# Altium PCB Audio-Switch-v2.0.PcbDoc (part 3 of 3)
Units mil, origin at the board's own origin, x right, y up, seen from the top; angles counter-clockwise.
Board outline 3937.01 x 3149.61 mil, 4 copper layers (Top Layer, Ground Layer, Power Layer, Bottom Layer), stack 60.4 mil thick; 165 components, 115 nets, 627 pads, 263 vias.
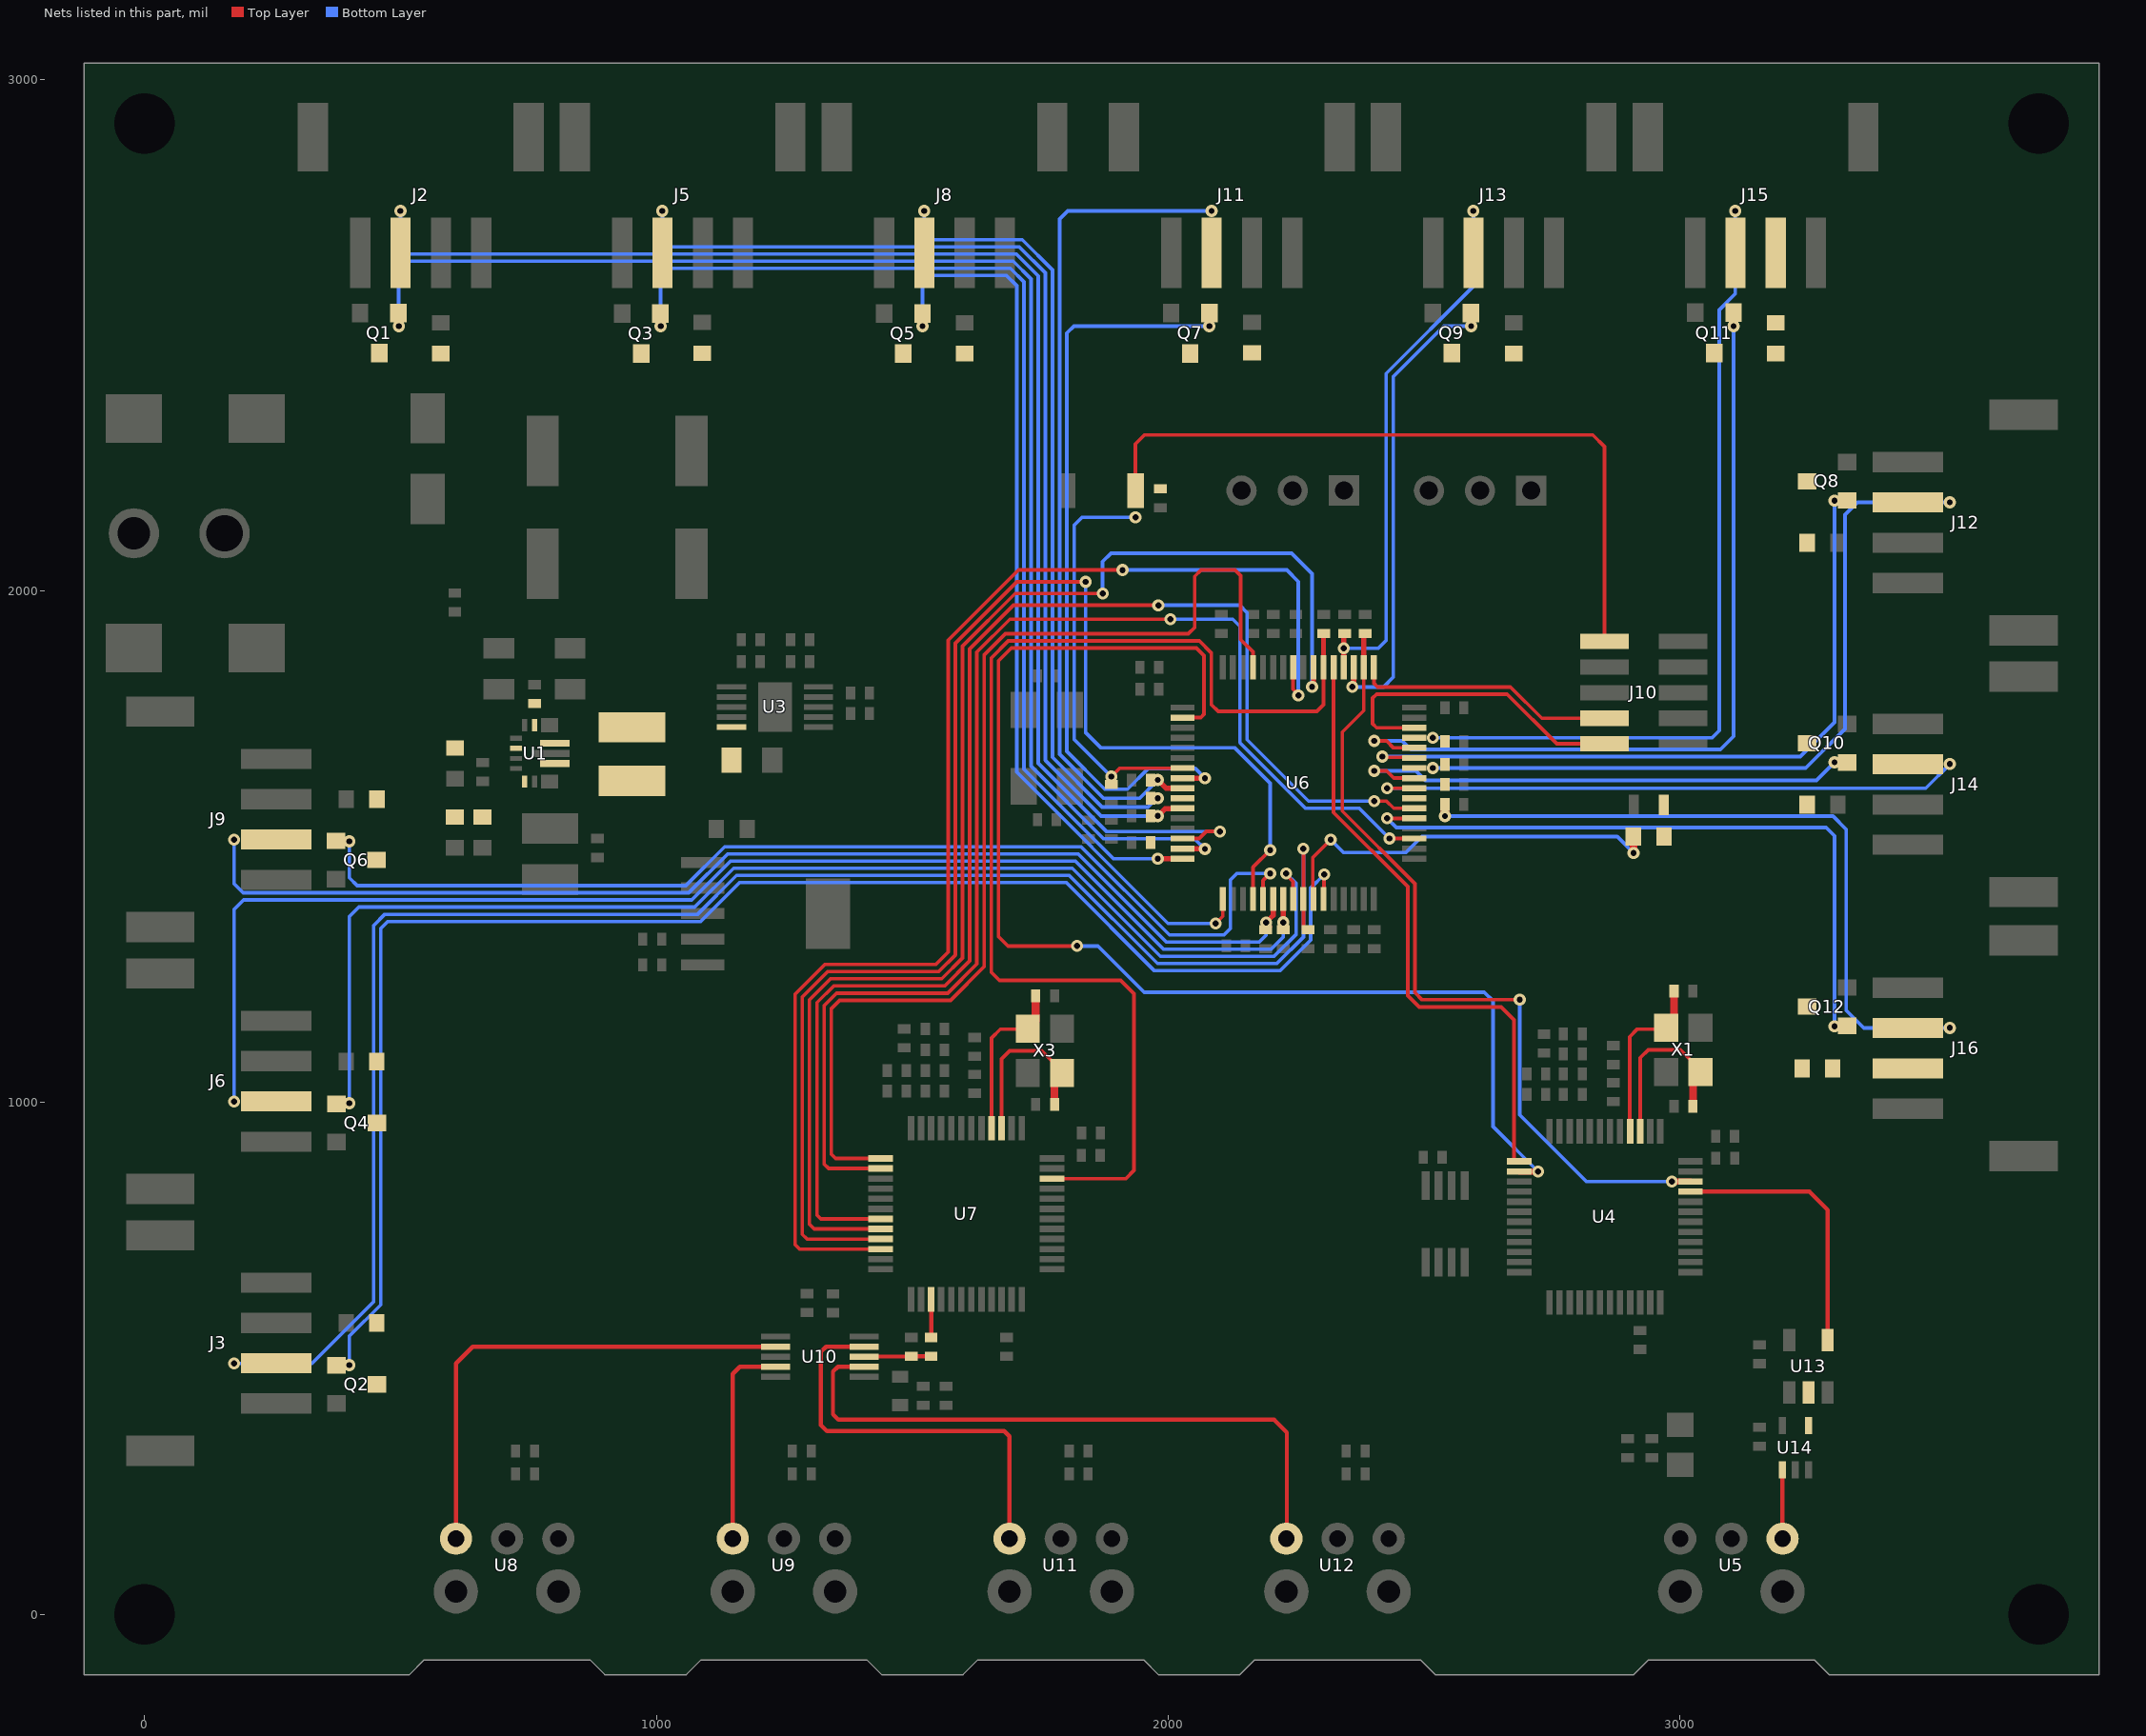
[diagram p4: the nets of this part, all layers, seen from the top]

## Via types
v1: diameter 23.62, hole 11.81, Top Layer to Bottom Layer, 263 vias

## Nets (pads, with @x,y where several pads share a name; then routed paths per layer and width w, separated by ;. In a path a pad name is that pad's centre, name@x,y a point inside that pad or via, vN(x,y) a via of type N, cw(c..) or ccw(c..) an arc to the next point about the centre after c; other vN are vias at no path point) (continued)
NetJ15_2: J15.2 R38.2
NetJ16_2: J16.2 R39.2
NetL1_1: L1.1 U1.11
NetL1_2: L1.2 U1.9
NetLED1_1: LED1.1 R16.2
NetQ1_3: Q1.3 R9.1
NetQ2_3: Q2.3 R10.1
NetQ3_3: Q3.3 R12.1
NetQ4_3: Q4.3 R13.1
NetQ5_3: Q5.3 R17.1
NetQ6_3: Q6.3 R18.1
NetQ7_3: Q7.3 R20.1
NetQ8_3: Q8.3 R21.1
NetQ9_3: Q9.3 R35.1
NetQ10_3: Q10.3 R36.1
NetQ11_3: Q11.3 R38.1
NetQ12_3: Q12.3 R39.1
NetR1_2: R1.2 U1.14
NetR2_1: R2.1 R4.2 U1.5
NetR3_1: R3.1 U1.2
NetR5_1: R5.1 U3.5
NetR44_2: R44.2 U7.15 | length 74.6
  Top Layer w7: R44.2@1536.69,540.99 R44.2@1537.8,542.09
  Top Layer w8.28: R44.2@1536.8,542.09 U7.15@1536.8,615.17
OUT1_LED1: Q1.1 U6.15 | length 2771.1
  Top Layer w10: U6.15@2028.11,1496.49 2028.52,1496.09 2071.36,1496.09 v1(2071.77,1495.68)
  Bottom Layer w7: v1(496.44,2517.83) 496.44,2629.31 511.84,2644.72 1697.45,2644.72 1732.06,2610.11 1732.06,1657.54 1873.64,1515.96 2051.49,1515.96 v1(2071.77,1495.68)
OUT1_LED2: Q3.1 U6.16 | length 2159.8
  Top Layer w10: v1(1979.88,1476.81) U6.16@2028.11,1476.81
  Bottom Layer w7: v1(1008.25,2517.83) 1008.25,2615.53 1023.44,2630.72 1691.65,2630.72 1718.06,2604.32 1718.06,1651.74 1892.99,1476.81 v1(1979.88,1476.81)
OUT1_LED3: Q5.1 U6.17 | length 1798
  Top Layer w7: v1(2092.97,1350.09) 2106.85,1363.95 U6.17@2106.85,1398.07
  Bottom Layer w7: v1(1520.06,2517.83) 1520.06,2601.03 1535.75,2616.72 1684.05,2616.72 1704.06,2596.72 1704.06,1645.94 1999.92,1350.08 v1(2092.97,1350.09)
OUT1_SW1: J2.3 R24.1 U6.14 | length 2782.4
  Top Layer w7: U6.14@2028.11,1516.18 2060.72,1516.18 2074.9,1530.36 2100.54,1530.36 v1(2100.95,1529.96)
  Bottom Layer w7: v1(499.79,2742.93) 499.79,2671.35 512.42,2658.72 1703.25,2658.72 1746.06,2615.91 1746.06,1663.34 1879.44,1529.96 v1(2100.95,1529.96)
OUT1_SW2: J5.3 R25.1 U6.11 | length 2117.6
  Top Layer w7: R25.1@1965.72,1560.16 1970.25,1560.16 1970.25,1568.09 R25.1@1971.22,1569.07
  Top Layer w10: v1(1979.88,1560.16) 1994.05,1574.33 2027.21,1574.33 U6.11@2028.11,1575.23
  Bottom Layer w7: v1(1011.6,2742.93) 1011.6,2686.44 1025.32,2672.72 1709.05,2672.72 1760.06,2621.71 1760.06,1669.14 1869.04,1560.16 v1(1979.88,1560.16)
OUT1_SW3: J8.3 R26.1 U6.10 | length 1529.8
  Bottom Layer w7: v1(1523.41,2742.93) 1523.41,2699.12 1535.81,2686.72 1714.85,2686.72 1774.06,2627.51 1774.06,1674.94 1871.08,1577.91 1960.81,1577.91 1977.91,1595.01 v1(1979.88,1595.01)
OUT2_LED1: Q7.1 U6.8 | length 1470.6
  Top Layer w7: U6.8@2028.11,1634.29 U6.8@2028.25,1634.15 ; v1@2071.77,1634.15 v1(2071.91,1634.01)
  Top Layer w10: U6.8@2028.25,1634.15 v1@2071.77,1634.15
  Bottom Layer w7: v1(2071.91,1634.01) 2053.01,1652.91 1960.87,1652.91 1920.52,1612.57 1876.02,1612.57 1802.06,1686.54 1802.06,2504.07 1815.81,2517.83 v1(2080.44,2517.83)
OUT2_LED2: Q9.1 U6.51 | length 908
  Top Layer w10: v1(2360.13,1812.45) v1@2361.85,1814.17 ; U6.51@2361.85,1849.92 U6.51@2362.76,1850.82 ; v1@2362.85,1814.17 U6.51@2362.85,1849.92
  Bottom Layer w7: v1(2360.13,1812.45) 2420.86,1812.45 2439.95,1831.53 2439.95,2419.16 2538.62,2517.83 v1(2592.25,2517.83)
OUT2_LED3: Q11.1 U6.44 | length 1606.1
  Top Layer w7: v1(2402.49,1707.12) 2426.79,1707.12 2440.57,1693.34 U6.44@2480.87,1693.34
  Bottom Layer w7: v1(2402.49,1707.12) 2457.5,1707.12 2474.38,1690.25 3079.25,1690.25 3105.06,1716.06 v1(3105.06,2517.83)
OUT2_SW1: J11.3 R27.1 U6.9 | length 1646.6
  Top Layer w10: v1(1979.88,1630.6) 1995.88,1614.6 U6.9@2028.11,1614.6
  Bottom Layer w7: v1(1979.88,1630.6) 1944.23,1594.95 1873.84,1594.95 1788.06,1680.74 1788.06,2727.07 1803.91,2742.93 v1(2084.79,2742.93)
OUT2_SW2: J13.3 R28.1 U6.52 | length 1065.6
  Top Layer w10: v1@2343.04,1888 R28.1@2343.04,1916.95 ; U6.52@2343.07,1850.82 v1(2343.07,1888)
  Bottom Layer w7: v1(2343.07,1888) 2410.53,1888 2425.95,1903.41 2425.95,2424.96 2596.6,2595.61 v1(2596.6,2742.93)
OUT2_SW3: J15.3 R29.1 U6.45 | length 1594.7
  Bottom Layer w7: v1(2517,1713.06) 3063.1,1713.06 3077.17,1727.12 3077.17,2549.58 3108.41,2580.82 v1(3108.41,2742.93)
OUT3_LED1: Q2.1 U6.27 | length 3017.2
  Top Layer w7: U6.27@2303.7,1398.07 2304.34,1398.71 2304.34,1445.41 v1(2304.98,1446.05)
  Bottom Layer w7: v1(399.91,486.95) 399.91,543.45 461.25,604.79 461.25,1340.32 474.94,1354.02 1086.36,1354.02 1162.43,1430.09 1801.12,1430.09 1973.43,1257.78 2218.49,1257.78 2278.33,1317.62 2278.33,1419.4 v1(2304.98,1446.05)
OUT3_LED2: Q4.1 U6.24 | length 2526.2
  Top Layer w7: v1(2230.39,1447.86) 2230.39,1446.05 2244.24,1432.19 2244.24,1398.47 U6.24@2244.65,1398.07
  Bottom Layer w7: v1(399.91,998.76) 399.91,1363.39 418.54,1382.02 1074.76,1382.02 1150.83,1458.09 1812.72,1458.09 1985.03,1285.78 2206.9,1285.78 2250.33,1329.21 2250.33,1427.91 v1(2230.39,1447.86)
OUT3_LED3: Q6.1 U6.21 | length 2140.6
  Top Layer w7: U6.21@2185.59,1398.07 2185.59,1434.08 v1(2199.37,1447.86)
  Bottom Layer w7: v1(399.91,1510.57) 399.91,1439.5 415.39,1424.02 1057.36,1424.02 1133.43,1500.09 1830.11,1500.09 2002.42,1327.78 2108.96,1327.78 2121.66,1340.47 2121.66,1435.29 2134.23,1447.86 v1(2199.37,1447.86)
OUT3_SW1: J3.3 R30.1 U6.25 | length 3339.8
  Top Layer w7: R30.1@2264.33,1337.97 v1(2264.33,1496.49)
  Bottom Layer w7: v1(174.81,490.3) 326.96,490.3 447.25,610.59 447.25,1346.12 469.14,1368.02 1080.56,1368.02 1156.63,1444.09 1806.92,1444.09 1979.23,1271.78 2212.69,1271.78 2264.33,1323.42 v1(2264.33,1496.49)
OUT3_SW2: J6.3 R31.1 U6.23 | length 2620.3
  Top Layer w10: v1(2224.96,1352.27) U6.23@2224.96,1398.07
  Bottom Layer w7: v1(174.81,1002.11) 174.81,1377.39 193.43,1396.02 1068.96,1396.02 1145.03,1472.09 1818.52,1472.09 1990.82,1299.78 2201.1,1299.78 2224.96,1323.64 v1(2224.96,1352.27)
OUT3_SW3: J9.3 R32.1 U6.22 | length 2313.1
  Top Layer w7: R32.1@2194.09,1337.97 R32.1@2199.59,1343.47
  Top Layer w10: R32.1@2190.59,1340.55 v1@2190.59,1350.47 ; v1(2191.55,1352.24) 2205.28,1365.97 U6.22@2205.28,1398.07
  Bottom Layer w7: v1(174.81,1513.92) 174.81,1427.61 192.4,1410.02 1063.16,1410.02 1139.23,1486.09 1824.32,1486.09 1990.01,1320.39 1996.62,1313.78 2178.16,1313.78 2191.55,1327.16 v1(2191.55,1352.24)
OUT4_LED1: Q8.1 U6.43 | length 1408.9
  Top Layer w7: v1(2418.35,1676.27) 2419.65,1674.97 2479.56,1674.97 U6.43@2480.87,1673.66
  Bottom Layer w7: v1(2418.35,1676.27) 2418.38,1676.31 2468.51,1676.31 2468.58,1676.25 3235.22,1676.25 3302.38,1743.42 v1(3302.38,2176.82)
OUT4_LED2: Q10.1 U6.41 | length 1006.2
  Top Layer w7: v1(2402.49,1648.47) 2426.88,1648.47 2441.06,1634.29 U6.41@2480.87,1634.29
  Bottom Layer w7: v1(2402.49,1648.47) 2484.09,1648.47 2502.58,1629.99 3267.15,1629.99 v1(3302.21,1665.05)
OUT4_LED3: Q12.1 U6.37 | length 1313.5
  Top Layer w7: v1(2428,1555.55) U6.37@2480.87,1555.55
  Bottom Layer w7: v1(2428,1555.55) 2445.87,1537.68 3286.18,1537.68 3302.38,1521.48 v1(3302.38,1149.34)
OUT4_SW1: J12.3 R33.1 U6.42 | length 1470.8
  Bottom Layer w7: v1(2517,1653.94) v1(2517,1653.94) 3246.16,1653.97 3322.74,1730.55 3322.74,2148.91 3347.29,2173.47 v1(3527.48,2173.47)
OUT4_SW2: J14.3 R34.1 U6.40 | length 1169.4
  Top Layer w7: v1(2428,1614.6) U6.40@2478.39,1614.6
  Bottom Layer w7: v1(2428,1614.6) 3480.43,1614.6 v1(3527.48,1661.66)
OUT4_SW3: J16.3 R37.1 U6.39 | length 1387.6
  Top Layer w17: v1(2541,1560) R37.1@2540.98,1582.42
  Bottom Layer w7: v1(2541,1560) 3299.26,1560 3325.15,1534.11 3325.15,1180.4 3359.56,1145.99 v1(3527.48,1145.99)
OUT_CK: U6.55 U7.8 | length 2596.3
  Top Layer w7: U7.8@1438.37,752.96 1308.36,752.96 1299.1,762.22 1299.1,1200.59 1340.51,1242 1557.62,1242 1598.31,1282.69 1598.31,1892.24 1701.07,1995 v1(1872,1995)
  Top Layer w10: v1(2281.39,1812.45) v1@2283.11,1814.17 ; U6.55@2283.11,1849.92 U6.55@2284.02,1850.82 ; v1@2284.11,1814.17 U6.55@2284.11,1849.92
  Bottom Layer w7: v1(1872,1995) 1872,2057.44 1888.37,2073.8 2241.11,2073.8 2281.39,2033.52 v1(2281.39,1812.45)
OUT_MCK: U6.38 U7.7 | length 2698.4
  Top Layer w7: U7.7@1438.37,772.65 1321.32,772.65 1313.96,780 1313.96,1195.65 1346.31,1228 1563.42,1228 1612.31,1276.89 1612.31,1886.44 1697.93,1972.05 v1(1980.87,1972.05) ; v1(2402.49,1589.42) 2426.77,1589.42 2440.96,1575.23 U6.38@2480.87,1575.23
  Bottom Layer w7: v1(1980.87,1972.05) 2139.76,1972.05 2154.31,1957.5 2154.31,1709.37 2274.27,1589.42 v1(2402.49,1589.42)
OUT_SD: U6.57 U7.10 | length 2635.4
  Top Layer w7: U7.10@1438.37,713.59 1280.07,713.59 1271.1,722.56 1271.1,1212.19 1328.91,1270 1546.02,1270 1570.31,1294.29 1570.31,1903.84 1707.48,2041 v1(1911,2041) ; U6.57@2244.21,1850.38 2244.21,1808.11 2254.49,1797.83 v1(2254.49,1795.7)
  Bottom Layer w7: v1(1911,2041) 2232.03,2041 2254.49,2018.54 v1(2254.49,1795.7)
OUT_WS: U6.20 U7.9 | length 2804
  Top Layer w7: U7.9@1438.37,733.28 1294.36,733.28 1285.1,742.53 1285.1,1206.39 1334.71,1256 1551.82,1256 1584.31,1288.49 1584.31,1898.04 1704.28,2018 v1(1838.57,2018) ; U6.20@2165.91,1398.07 2165.91,1460.12 v1(2199.37,1493.59)
  Bottom Layer w7: v1(1838.57,2018) 1838.57,1723.81 1869.04,1693.34 2130.37,1693.34 2199.37,1624.34 v1(2199.37,1493.59)
OUT_Y: U13.2 U14.4
PB0: R16.1 U6.26 | length 792.2
  Top Layer w7: U6.26@2284.02,1398.07 2282.67,1399.41 2282.67,1479.19 v1(2317.48,1514) ; R16.1@2908.96,1520 R16.1@2909.17,1519.79
  Top Layer w15: R16.1@2908.96,1520 2909.41,1519.55 2909.41,1488.24 v1(2909.65,1488)
  Bottom Layer w7: v1(2317.48,1514) 2342.53,1488.95 2464.67,1488.95 2495.71,1520 2877.65,1520 v1(2909.65,1488)
PCM1_ERROR/INT0: U4.1 U6.53 | length 1209.7
  Top Layer w7: U6.53@2323.39,1850.82 2323.39,1566.86 2468.23,1422.02 2468.23,1209.2 2490.79,1186.65 2650.91,1186.65 2675.75,1161.81 2675.75,891.41
  Top Layer w12: U4.1@2675.84,885.32 2676.14,885.02 U4.1@2686.28,885.02
PCM1_NPCM/INT1: U4.2 U6.2 | length 2541.5
  Top Layer w7: v1(1821.93,1306.09) 1686.88,1306.09 1668.31,1324.66 1668.31,1863.24 1693.5,1888.43 2055.33,1888.43 2070,1873.76 2070,1759 2063.82,1752.82 2028.54,1752.82 U6.2@2028.11,1752.4
  Top Layer w12: U4.2@2686.28,865.33 2686.37,865.24 2722.76,865.24 v1(2722.85,865.15)
  Bottom Layer w7: v1(1821.93,1306.09) 1863.08,1306.09 1953.39,1215.78 2617.71,1215.78 2634.75,1198.74 2634.75,953.25 v1(2722.85,865.15)
PCM2_ERROR/INT0: U6.61 U7.1 | length 2149.2
  Top Layer w7: U7.1@1438.37,890.76 1350.03,890.76 1341.96,898.83 1341.96,1184.05 1357.91,1200 1575.02,1200 1640.31,1265.29 1640.31,1874.84 1681.9,1916.43 2039.52,1916.43 2051.73,1928.64 2051.73,2028.44 2064.51,2041.22 2130.53,2041.22 2141.68,2030.08 2141.68,1904.9 2165.73,1880.84 2165.73,1851 U6.61@2165.91,1850.82
PCM2_NPCM/INT1: U6.35 U7.2 | length 2557.7
  Top Layer w7: U7.2@1438.37,871.07 1336.63,871.07 1327.96,879.74 1327.96,1189.85 1352.11,1214 1569.22,1214 1626.31,1271.09 1626.31,1880.64 1690.62,1944.95 v1(2004.49,1944.95) ; v1(2432.54,1516.27) v1(2432.54,1516.27) 2480.82,1516.22 U6.35@2480.87,1516.18
  Bottom Layer w7: v1(2004.49,1944.95) 2126.39,1944.95 2140.31,1931.03 2140.31,1703.58 2268.47,1575.42 2373.39,1575.42 v1(2432.54,1516.27)
PCM_RST1: R15.2 U4.34 U6.50 | length 1607.6
  Top Layer w7: U6.50@2382.44,1850.82 2382.44,1766.18 2340.41,1724.15 2340.41,1569.64 2482.23,1427.82 2482.23,1215 2496.23,1201 v1(2687.1,1201)
  Top Layer w10: U6.50@2382.44,1850.82 2382.44,1887.27 2382.44,1910.45 2388.94,1916.95 R15.2@2392.44,1916.95
  Top Layer w12: v1@2984.44,845.74 U4.34@3020.83,845.74
  Bottom Layer w7: v1(2687.1,1201) 2687.1,975.85 2817.12,845.83 v1(2984.35,845.83)
PCM_RST2: R19.2 U6.54 U7.34 | length 2347.3
  Top Layer w7: U7.34@1773.02,851.39 1917.39,851.39 1933.32,867.32 1933.32,1212.74 1907.36,1238.7 1670.29,1238.7 1654.31,1254.68 1654.31,1869.04 1687.7,1902.43 2061.13,1902.43 2084.26,1879.29 2084.26,1778.22 2097.8,1764.69 2290.4,1764.69 2303.7,1777.99 U6.54@2303.7,1850.82
  Top Layer w10: U6.54@2303.7,1850.82 2303.7,1916.16 R19.2@2304.49,1916.95
RST: C32.2 J10.10 R8.1 SW1.1 U6.7 | length 2199.3
  Top Layer w7: v1(1888.98,1637.26) 1905.23,1653.51 2027.65,1653.51 U6.7@2028.11,1653.97 ; SW1.1@1936.18,2196.25 1936.18,2287.43 1953.75,2305 2829.96,2305 2852.72,2282.24 J10.10@2852.72,1901.25
  Bottom Layer w7: v1(1888.98,1637.26) 1816.26,1709.98 1816.26,2128.7 1831.71,2144.15 v1(1936.18,2144.15)
SPDIF-IN: U5.3 U14.1 | length 134.8
  Top Layer w8.28: U14.1@3200.16,282.09 3200.45,281.8 3200.45,147.84 U5.3@3200.75,147.55
SPDIF-INN: U4.33 U13.4 | length 520.8
  Top Layer w8.28: U4.33@3037.44,825.96 3253.02,825.96 3288.74,790.24 U13.4@3288.74,535.58
SPDIF-OUT: R43.2 R44.1 U10.8 | length 109.7
  Top Layer w8.28: U10.8@1427.15,503.64 1498.08,503.64 R43.2@1498.43,503.99 R44.1@1536.69,503.99
SPDIF-OUT1: U8.1 U10.2 | length 980.9
  Top Layer w8.28: U8.1@608.23,147.55 608.23,490.23 640.98,522.98 U10.2@1232.87,522.98
SPDIF-OUT2: U9.1 U10.4 | length 411.7
  Top Layer w8.28: U9.1@1149.17,147.54 1149.17,469.83 1162.95,483.61 U10.4@1232.87,483.61
SPDIF-OUT3: U10.9 U11.1 | length 810.1
  Top Layer w8.28: U10.9@1406.1,522.98 1331.35,522.98 1321.36,512.99 1321.36,369.61 1332.97,358 1679.65,358 1690,347.65 U11.1@1690,147.55
SPDIF-OUT4: U10.7 U12.1 | length 1258.2
  Top Layer w8.28: U10.7@1406.1,483.61 1354.52,483.61 1345,474.09 1345,390.61 1355.61,380 2207.17,380 2232,355.17 2232,148.49 U12.1@2231.06,147.55
SWDCLK: J10.4 U6.49 | length 510.2
  Top Layer w7: U6.49@2402.13,1850.82 2402.13,1819.45 2409.14,1812.45 2669.09,1812.45 2730.28,1751.25 J10.4@2852.72,1751.25
SWDIO: J10.2 U6.46 | length 631.2
  Top Layer w7: U6.46@2480.87,1732.71 2407.31,1732.71 2399.69,1740.34 2399.69,1790.7 2407.44,1798.45 2662.55,1798.45 2759.75,1701.25 J10.2@2852.72,1701.25
XTI_1: C30.2 U4.39 X1.1 | length 361.6
  Top Layer w7: U4.39@2922.5,944.07 2922.5,1087.5 2938.25,1103.24 3001.19,1103.24 3040.56,1063.87 X1.1@3040.56,1059.94 X1.1@3025.6,1044.97
  Top Layer w15: C30.2@3025.6,992.75 X1.1@3025.6,1044.97
XTI_2: C65.2 U7.39 X3.1 | length 347.8
  Top Layer w7: U7.39@1674.59,949.81 1674.59,1085.5 1690.34,1101.24 1753.28,1101.24 1792.65,1061.87 X3.1@1792.65,1057.94 X3.1@1778,1043.28
  Top Layer w15: C65.2@1778,996.75 X3.1@1778,1043.28
XTO_1: C31.2 U4.40 X1.3 | length 371.6
  Top Layer w7: U4.40@2902.17,944.72 2902.17,1128.71 2917.18,1143.72 X1.3@2970.81,1143.72 ; X1.3@2973.64,1132 2959.08,1132 X1.3@2970.81,1143.72 ; X1.3@2988.61,1161.52 X1.3@2973.64,1146.55 X1.3@2970.81,1143.72
  Top Layer w15: X1.3@2988.61,1161.52 C31.2@2988.61,1218
XTO_2: C66.2 U7.40 X3.3 | length 359.4
  Top Layer w7: U7.40@1654.91,949.81 1654.91,1126.23 1672.27,1143.59 X3.3@1724.76,1143.59 ; X3.3@1725.73,1130 1711.17,1130 X3.3@1724.76,1143.59 ; X3.3@1741,1159.82 X3.3@1725.73,1144.55 X3.3@1724.76,1143.59
  Top Layer w15: X3.3@1741,1159.82 C66.2@1741,1209
pads on no net: J1.3 J1.MH1 J1.MH2 J2.P1 J2.P2 J3.P1 J3.P2 J5.P1 J5.P2 J6.P1 J6.P2 J8.P1 J8.P2 J9.P1 J9.P2 J10.6 J10.7 J10.8 J11.P1 J11.P2 J12.P1 J12.P2 J13.P1 J13.P2 J14.P1 J14.P2 J15.P1 J15.P2 J16.P1 J16.P2 U3.4 U4.3 U4.4 U4.5 U4.6 U4.7 U4.8 U4.9 U4.10 U4.11 U4.12 U4.13 U4.14 U4.15 U4.16 U4.20 U4.28 U4.29 U4.30 U4.31 U4.32 U4.35 U4.37 U4.47 U4.48 U5.4 U5.5 U6.3 U6.4 U6.56 U7.3 U7.4 U7.5 U7.6 U7.11 U7.12 U7.13 U7.14 U7.16 U7.17 U7.18 U7.19 U7.20 U7.28 U7.29 U7.30 U7.31 U7.32 U7.33 U7.35 U7.37 U7.47 U7.48 U8.4 U8.5 U9.4 U9.5 U11.4 U11.5 U12.4 U12.5

## Polygon pours and split planes (outlines as drawn)
NetR2_1 on Top Layer "NETR2_1_L01_P000" (solid, pour order 0): 588.63,1592.99 677.51,1592.99 677.51,1627.53 747.25,1627.53 747.25,1577.64 723.23,1577.64 723.23,1543.14 588.63,1543.15
GND on Top Layer "GND_L01_P005" (solid, pour order 5): -118.11,-118.11 -118.11,3031.5 3818.9,3031.5 3818.9,-118.11
DC_IN on Top Layer "DC_IN_L01_P001" (solid, pour order 1): 1100.33,2122.49 1100.33,1984.69 381.57,1984.69 381.57,2238.84 606.02,2238.84 606.02,2122.49
DC_IN on Bottom Layer "DC_IN_L04_P002" (solid, pour order 2): 1070,1815.41 1074.59,1820 1128.59,1820 1133.59,1815 1133.59,1736.71 1142.51,1727.79 1343.17,1727.79 1350,1720.96 1350,1635.83 1344.17,1630 1080,1630 1070,1640
3V3 on Bottom Layer "3V3_L04_P003" (solid, pour order 3): 1583.73,866.27 1598.61,851.39 1819.03,851.39 1828.9,861.25 1828.9,948.77 1817.2,960.46 1685.9,960.46 1670,976.36 1670,1181.14 1661.14,1190 1594.41,1190 1583.73,1179.32
GND on Bottom Layer "GND_L04_P004" (solid, pour order 4): -118.11,-118.11 -118.11,3031.5 3818.9,3031.5 3818.9,-118.11
5V on Power Layer (split plane): 1668.57,2118.61 1668.57,1193 1668.91,1190.39 1669.92,1187.95 1671.52,1185.87 1716.53,1140.85 1718.62,1139.25 1721.06,1138.24 1723.67,1137.9 2807.69,1137.9 2807.69,955.09 1528.2,955.09 1479,1004.29 1479,1976.18 1478.65,1978.79 1477.94,1980.51 1477.65,1981.22 1476.04,1983.31 1453.22,2006.13 1451.13,2007.73 1448.7,2008.74 1446.09,2009.09 1307.85,2009.09 1305.24,2008.74 1302.81,2007.73 1300.72,2006.13 1278.87,1984.28 1277.26,1982.19 1276.26,1979.76 1275.91,1977.15 1275.91,1492.72 1143.34,1492.72 1140.73,1492.38 1139.01,1491.66 1138.3,1491.37 1136.21,1489.77 1058.59,1412.14 585.46,1412.14 563.96,1433.64 563.96,1762.69 584.18,1782.91 1002,1782.91 1004.61,1783.26 1007.04,1784.27 1009.13,1785.87 1054.13,1830.87 1055.74,1832.96 1056.74,1835.39 1057.09,1838 1057.09,2106.5 1092.57,2141.98 1645.19,2141.98
5V_FILT on Power Layer (split plane): 1458.83,1972 1458.83,1002.66 1458.53,1000.41 1458.83,998.16 1458.83,491.04 1459.17,488.43 1460.18,486 1461.78,483.91 1491.82,453.87 1493.91,452.26 1496.34,451.26 1498.95,450.91 3022.82,450.91 3040.91,432.82 3040.91,127.18 3022.82,109.09 676.06,109.09 662.09,123.06 662.09,624.21 677.79,639.91 1258.98,639.91 1261.59,640.26 1264.02,641.26 1266.11,642.87 1288.96,665.71 1291.04,666.58 1293.13,668.18 1294.73,670.27 1295.74,672.7 1296.09,675.31 1296.09,1482.63 1296.09,1502.47 1296.09,1972.97 1312.03,1988.91 1441.91,1988.91
3V3 on Power Layer (split plane): 3798.8,3011.4 3798.8,-98.02 3299.86,-98.02 3277.01,-75.17 3273.97,-72.67 3270.49,-70.81 3266.72,-69.67 3262.8,-69.28 2938.7,-69.28 2934.78,-69.67 2931.01,-70.81 2927.53,-72.67 2924.49,-75.17 2901.64,-98.02 2530.17,-98.02 2507.33,-75.17 2504.28,-72.67 2500.81,-70.81 2497.04,-69.67 2493.11,-69.28 2169.01,-69.28 2167.24,-69.46 2165.09,-69.67 2163.17,-70.25 2161.32,-70.81 2159.09,-72 2157.85,-72.67 2155.88,-74.28 2154.8,-75.17 2131.95,-98.01 1989.23,-98.01 1966.38,-75.17 1963.34,-72.67 1959.86,-70.81 1956.09,-69.67 1952.17,-69.28 1628.07,-69.28 1624.15,-69.67 1620.38,-70.81 1616.9,-72.67 1613.86,-75.17 1591,-98.02 1448.28,-98.02 1425.44,-75.17 1422.39,-72.67 1418.92,-70.82 1415.15,-69.67 1411.23,-69.29 1087.12,-69.29 1083.2,-69.67 1079.43,-70.82 1075.96,-72.67 1072.91,-75.17 1050.07,-98.01 907.34,-98.01 884.49,-75.17 881.45,-72.67 877.97,-70.81 874.2,-69.67 870.28,-69.28 546.18,-69.28 542.26,-69.67 538.49,-70.81 535.01,-72.67 531.97,-75.17 509.12,-98.01 -98.01,-98.01 -98.01,3011.4
GND on Ground Layer (split plane): 3798.8,3011.4 3798.8,-98.02 3299.86,-98.02 3277.01,-75.17 3273.97,-72.67 3270.49,-70.81 3266.72,-69.67 3262.8,-69.28 2938.7,-69.28 2934.78,-69.67 2931.01,-70.81 2927.53,-72.67 2924.49,-75.17 2901.64,-98.02 2530.17,-98.02 2507.33,-75.17 2504.28,-72.67 2500.81,-70.81 2497.04,-69.67 2493.11,-69.28 2169.01,-69.28 2167.24,-69.46 2165.09,-69.67 2163.17,-70.25 2161.32,-70.81 2159.09,-72 2157.85,-72.67 2155.88,-74.28 2154.8,-75.17 2131.95,-98.01 1989.23,-98.01 1966.38,-75.17 1963.34,-72.67 1959.86,-70.81 1956.09,-69.67 1952.17,-69.28 1628.07,-69.28 1624.15,-69.67 1620.38,-70.81 1616.9,-72.67 1613.86,-75.17 1591,-98.02 1448.28,-98.02 1425.44,-75.17 1422.39,-72.67 1418.92,-70.82 1415.15,-69.67 1411.23,-69.29 1087.12,-69.29 1083.2,-69.67 1079.43,-70.82 1075.96,-72.67 1072.91,-75.17 1050.07,-98.01 907.34,-98.01 884.49,-75.17 881.45,-72.67 877.97,-70.81 874.2,-69.67 870.28,-69.28 546.18,-69.28 542.26,-69.67 538.49,-70.81 535.01,-72.67 531.97,-75.17 509.12,-98.01 -98.01,-98.01 -98.01,3011.4

## Other copper
Top Layer:
  region net NetJ7_2: 2329.26,1309.97 2305.71,1309.97 2305.71,1280.72 2329.26,1280.72
  rectangle net 3V3: 2391.83,1337.95 2412.61,1357.86
  rectangle net GND: 2692.1,1003.75 2710.1,1068.19
  region net 3V3: 1692.71,2742.93 1669.1,2742.93 1669.1,2661.01 1692.71,2661.01
  rectangle net 5V: 2729.1,991.39 2747.1,1068.19
  rectangle net 3V3: 2192.78,1944.95 2397.94,1994
  rectangle net GND: 1831.99,1506.18 1901.49,1524.18
  rectangle net 3V3: 1919.72,1495.68 1937.72,1547.66
  rectangle net 3V3: 1876.49,1543.18 1937.72,1595.01
  rectangle net 3V3: 1919.72,1547.66 1937.72,1643.1
  rectangle net GND: 1772.49,1732.4 1953.62,1863.32
  rectangle net 3V3: 2568.99,1569.92 2586.98,1736.71
  rectangle net NetLED1_1: 2958.86,1519.79 2978.54,1601.61
  region net GND: 2414.26,1309.95 2390.71,1309.95 2390.71,1280.7 2414.26,1280.7
  region net GND: 2374.53,1309.96 2350.98,1309.96 2350.98,1280.71 2374.53,1280.71
  region net 3V3: 2285.11,1309.95 2261.56,1309.95 2261.56,1280.7 2285.11,1280.7
  rectangle net 3V3: 2141.94,1291.97 2285.83,1309.97
  rectangle net 5V: 918.23,1408.51 1133.14,1577.64
  rectangle net GND: 737.09,1405.64 896.99,1488.14
  rectangle net NetL1_1: 886.66,1695.44 1017.36,1763.15
  rectangle net DC_IN: 1307.22,1712.34 1330.79,1733.97
  rectangle net GND: 1037.34,2274.06 1100.33,2384.27
  rectangle net GND: 746.34,2274.06 809.33,2384.27
  rectangle net GND: -76.29,1841.17 110,1935.66
  rectangle net GND: 594.2,1937.24 617.81,1959.33
  region net GND: 2951.27,1813.08 2951.27,1789.47 3006.26,1789.47 3006.26,1813.08
  region net GND: 2951.27,1913.08 2951.27,1889.47 3006.26,1889.47 3006.26,1913.08
  rectangle net GND: 2959.02,1736.29 3053.5,1816.21
  rectangle net GND: 2910.15,497.78 2933.81,517.5
  region net GND: 2544.5,881.18 2544.5,918 2520.58,918 2520.58,881.18
  region net 3V3: 2480.26,904.82 2480.26,881.21 2507.5,881.21 2507.5,904.82
  region net GND: 2536.33,905.5 2520.58,905.5 2520.58,837.4 2536.33,837.4
  region net 3V3: 2510.74,905.5 2494.99,905.5 2494.99,837.4 2510.74,837.4
  rectangle net 3V3: 2909.5,545.5 2934.5,572.95
  region net GND: 3016.61,1229.78 3016.61,1206.22 3045.85,1206.22 3045.85,1229.78
  rectangle net XTI_2: 1769,984.25 1787,1009.25
  rectangle net 3V3: 2857.24,976.54 2882.24,1010.75
  rectangle net 3V3: 1609.24,986.29 1634.34,1027.18
  region net GND: 1769,1220.78 1769,1197.22 1798.24,1197.22 1798.24,1220.78
  region net GND: 1750,984.98 1750,1008.53 1720.76,1008.53 1720.76,984.98
  region net GND: 2997.6,980.98 2997.6,1004.53 2968.36,1004.53 2968.36,980.98
  rectangle net 3V3: 2857.97,1102.24 2881.52,1131.49
  rectangle net GND: 2857.24,1029.75 2882.24,1083.24
  rectangle net GND: 1609.34,1046.18 1634.34,1099.2
  rectangle net 3V3: 1610.06,1118.2 1633.61,1147.44
  rectangle net NetC49_2: 1553.7,1010 1571.68,1075.17
  rectangle net NetC64_1: 1553.7,1090.5 1571.7,1156.44
  rectangle net 3V3: 1609.24,949.81 1621.84,1027.18
  rectangle net GND: 1858.71,885.3 1876.72,953.3
  rectangle net GND: 3098,878.5 3116.01,946.5
  rectangle net 3V3: 1749,884.26 1839.71,964.88
  rectangle net GND: 1749,687.61 1797.03,719.89
  rectangle net GND: 1672.52,485.31 1696.13,512.56
  rectangle net 3V3: 1668.29,531.98 1700.58,639.18
  rectangle net A0: 1281.93,570.83 1305.54,598.07
  rectangle net A1: 1332.93,570.65 1356.54,597.89
  region net GND: 1357.07,635.5 1281.5,635.5 1281.5,617.32 1357.07,617.32
  region net GND: 1510.5,559.66 1486.89,559.66 1486.89,532.42 1510.5,532.42
  rectangle net NetFB1_2: 1232.87,458.02 1274.68,469.83
  rectangle net NetFB1_2: 1448,452.19 1491.75,475.81
  region net GND: 1578.07,464.16 1554.46,464.16 1554.46,436.92 1578.07,436.92
  region net GND: 1533.07,464.17 1509.46,464.17 1509.46,436.93 1533.07,436.93
  rectangle net 5V_FILT: 1460.25,396.62 1598.55,420.69
  rectangle net NetFB1_2: 1406.1,458.02 1448,469.83
  region net GND: 780.41,307.18 780.41,330.79 753.17,330.79 753.17,307.18
  region net GND: 780.41,262.18 780.41,285.79 753.17,285.79 753.17,262.18
  rectangle net 5V_FILT: 682.24,147.55 734.21,331.75
  region net GND: 1321.36,307.17 1321.36,330.78 1294.11,330.78 1294.11,307.17
  region net GND: 1321.36,262.17 1321.36,285.78 1294.11,285.78 1294.11,262.17
  rectangle net 5V_FILT: 1223.19,147.54 1275.16,331.74
  region net GND: 1862.3,307.18 1862.3,330.79 1835.06,330.79 1835.06,307.18
  region net GND: 1862.3,262.18 1862.3,285.79 1835.06,285.79 1835.06,262.18
  rectangle net 5V_FILT: 1764.13,147.55 1816.1,331.75
  rectangle net 5V_FILT: 2305.08,147.55 2357.05,331.5
  region net GND: 2403.24,262.18 2403.24,285.79 2376,285.79 2376,262.18
  region net GND: 2403.24,307.18 2403.24,330.79 2376,330.79 2376,307.18
  rectangle net 3V3: 3143.25,351.97 3207.05,385.44
  rectangle net GND: 3143.9,308.52 3167.56,328.24
  rectangle net GND: 3143.9,469.86 3167.56,489.58
  rectangle net 3V3: 3143.25,513.93 3213.94,557.23
  rectangle net OUT_Y: 3244.45,351.97 3258.23,433.22
  rectangle net GND: 2996.91,688.17 3044.94,707.85
  region net 3V3: 3079,878.72 3079,946.5 2996.91,946.5 2996.91,878.72
  region net 3V3: 2869.74,920.06 2869.74,1010.75 2857.14,1010.75 2857.14,920.06
  region net NetC29_1: 2818.5,1082.74 2818.5,1147 2800.5,1147 2800.5,1082.74
  region net NetC22_2: 2818.5,1003.75 2818.5,1068.19 2800.5,1068.19 2800.5,1003.75
  rectangle net OUT4_SW2: 2480.87,1608.7 2549.99,1620.51
  rectangle net OUT2_SW3: 2480.87,1707.12 2549.99,1718.93
  region net OUT3_SW2: 2236.77,1329.12 2236.77,1352.27 2213.15,1352.27 2213.15,1329.12
  region net OUT3_SW3: 2203.37,1329.08 2203.37,1352.24 2179.74,1352.24 2179.74,1329.08
  rectangle net OUT3_SW3: 2178.09,1328.97 2204.77,1346.97
  region net RST: 1900.8,1613.02 1900.8,1636.18 1877.17,1636.18 1877.17,1613.02
  rectangle net RST: 1876.49,1613.01 1901.49,1631.01
  rectangle net OUT1_SW2: 1956.72,1548.34 1979.88,1571.97
  rectangle net OUT1_SW1: 1956.72,1510.27 2051.73,1522.08
  rectangle net OUT2_SW1: 1956.72,1618.78 1979.88,1642.41
  rectangle net OUT1_SW3: 1956.72,1583.19 1979.88,1606.82
  region net OUT1_SW3: 2028.11,1600.83 1967.99,1600.83 1967.99,1589.01 2028.11,1589.01
  rectangle net 3V3: 2480.87,1766.18 2549.99,1777.99
  rectangle net OUT4_SW3: 2480.87,1589.01 2549.98,1600.82
  rectangle net OUT4_SW1: 2480.87,1648.07 2549.99,1659.88
  region net GND: 3310.01,2268.46 3310.01,2236.18 3445.56,2236.18 3445.56,2268.46
  rectangle net GND: 3013.42,2525.45 3045.7,2661.01
  rectangle net GND: 2501.61,2525.45 2533.89,2661.01
  region net GND: 3310.01,1756.65 3310.01,1723.66 3445.56,1723.66 3445.56,1756.65
  region net GND: 3310.01,1240.98 3310.01,1208.7 3445.56,1208.7 3445.56,1240.98
  rectangle net GND: 1989.54,2525.45 2022.08,2661.01
  rectangle net GND: 1972.67,2144.51 1996.28,2162.75
  rectangle net GND: 1935.62,1795.7 1953.62,1863.32
  region net GND: 1802.32,2208.75 1802.32,2184.46 1834,2184.46 1834,2208.75
  region net GND: 1926.38,1862.65 1926.38,1839.04 1944.62,1839.04 1944.62,1862.65
  region net GND: 2957.57,361.14 2933.96,361.14 2933.96,333.9 2957.57,333.9
  region net GND: 2909.57,361.14 2885.96,361.14 2885.96,333.9 2909.57,333.9
  rectangle net GND: 1428.42,2525.45 1460.7,2661.01
  region net GND: 1434.57,1788.71 1434.57,1812.32 1416.33,1812.32 1416.33,1788.71
  region net GND: 1434.57,1748.83 1434.57,1772.44 1416.33,1772.44 1416.33,1748.83
  rectangle net GND: 1193.76,1849.84 1271.33,1917.67
  rectangle net GND: 1231.83,1767.83 1345.41,1778.85
  region net GND: 1256.64,1657.69 1256.64,1681.26 1226.79,1681.26 1226.79,1657.69
  region net GND: 1726.26,1564.51 1726.26,1540.9 1744.5,1540.9 1744.5,1564.51
  rectangle net GND: 1162.29,1309.44 1334.92,1429.01
  region net GND: 1204.54,1523.28 1204.54,1546.89 1177.29,1546.89 1177.29,1523.28
  rectangle net GND: 1090.82,1358.51 1256,1380.16
  region net GND: 951.28,1281.16 951.28,1257.55 973.37,1257.55 973.37,1281.16
  region net GND: 951.28,1331.16 951.28,1307.55 973.37,1307.55 973.37,1331.16
  rectangle net GND: 916.61,2525.45 948.89,2661.01
  region net GND: 843.33,1915.68 819.72,1915.68 819.72,1888.43 843.33,1888.43
  region net GND: 723.23,1743.57 723.23,1731.76 742.33,1731.76 742.33,1743.57
  rectangle net GND: 404.79,2525.45 437.08,2661.01
  region net GND: 703.83,1915.68 680.22,1915.68 680.22,1888.43 703.83,1888.43
  rectangle net GND: 872.67,1457.05 896.27,1479.14
  rectangle net GND: 700.01,1648.2 725.59,1658.04
  rectangle net GND: 757.09,1599.53 766.93,1639.34
  rectangle net GND: 648.55,1605.71 672.15,1627.81
  rectangle net GND: 594.31,1470.9 617.92,1498.15
  region net GND: 392.28,1418.93 392.28,1451.21 256.73,1451.21 256.73,1418.93
  region net GND: 392.28,907.11 392.28,939.4 256.73,939.4 256.73,907.11
  region net GND: 392.28,395.3 392.28,427.59 256.73,427.59 256.73,395.3
  rectangle net 3V3: 3254.73,2579.08 3278.34,2661.01
  region net 3V3: 3363.64,2027.15 3363.64,2003.54 3445.56,2003.54 3445.56,2027.15
  rectangle net 3V3: 2742.92,2579.08 2766.53,2661.01
  rectangle net 3V3: 2231.11,2579.08 2254.71,2661.01
  region net 3V3: 3363.64,1515.34 3363.64,1491.73 3445.56,1491.73 3445.56,1515.34
  region net 3V3: 3363.64,999.67 3363.64,976.06 3445.56,976.06 3445.56,999.67
  rectangle net 3V3: 2097.94,1827.2 2109.76,1916.95
  rectangle net 3V3: 1972.62,1766.18 2051.73,1863.32
  rectangle net 3V3: 1831.99,1543.18 1901.49,1561.18
  rectangle net 3V3: 1157.92,2579.08 1181.53,2661.01
  rectangle net 3V3: 646.11,2579.08 669.71,2661.01
  region net 3V3: 338.66,1660.24 338.66,1683.85 256.73,1683.85 256.73,1660.24
  rectangle net 3V3: 1010.37,1308.51 1133.14,1330.16
  region net 3V3: 338.66,1148.43 338.66,1172.03 256.73,1172.03 256.73,1148.43
  region net 3V3: 338.66,636.62 338.66,660.22 256.73,660.22 256.73,636.62
  rectangle net RST: 1920.04,2190.75 1996.99,2230.11
  rectangle net DC_IN: 1086,1767.83 1175.33,1818.22
  rectangle net NetC16_2: 1370.33,1748.15 1388.33,1813.03
  rectangle net NetR5_1: 1126.79,1644.34 1166.79,1734.97
  rectangle net 5V_FILT: 1288.32,1787.51 1345.41,1917.66
  rectangle net NetC16_2: 1316.87,1748.14 1379.33,1759.16
  rectangle net DC_IN: 883.01,1802.82 1175.33,2122.49
  rectangle net DC_IN: 696.84,1758.42 722.01,1802.82
  rectangle net DC_IN: 662.01,1707.25 703.09,1844.43
  rectangle net DC_IN: 662.01,1707.25 737.4,1717.09
  rectangle net DC_IN: 791.54,1723.98 873.23,1828.43
  rectangle net DC_IN: 662.01,1802.82 908.23,1844.43
  rectangle net 5V: 648.19,1470.9 671.8,1498.14
  rectangle net 5V: 642.51,1483.14 677.51,1525.14
  rectangle net 5V: 783.36,1505.64 823.61,1641.31
  rectangle net 5V: 723.23,1505.64 1132.29,1577.64
  rectangle net 5V: 642.51,1505.64 829.92,1525.14
  rectangle net NetC10_2: 1010.37,1258.51 1133.14,1280.16
  rectangle net NetD1_2: -76.29,2288.35 527.28,2386.78
  rectangle net RST: 1924.36,2144.15 1947.97,2196.25
  region net RST: 1920.04,2230.11 1920.04,2162.39 1952.32,2162.39 1952.32,2230.11
  region net 5V_FILT: 3012.57,404.49 2988.96,404.49 2988.96,370.43 3012.57,370.43
  rectangle net NetC20_2: 2880.25,238.62 3026.73,315.31
  rectangle net NetC20_2: 2974.76,147.55 3026.73,315.31
  region net NetJ3_2: 408.54,551.5 408.54,586.5 256.73,586.5 256.73,551.5
  region net NetQ2_3: 468.54,448.85 468.54,587.5 438.54,587.5 438.54,448.85
  region net OUT3_LED1: 399.91,475.13 399.91,498.73 374.17,498.73 374.17,475.13
  region net OUT3_SW1: 174.81,502.12 174.81,478.51 256.73,478.51 256.73,502.12
  region net NetJ6_2: 408.54,1063.31 408.54,1098.31 256.73,1098.31 256.73,1063.31
  region net NetQ4_3: 468.54,960.66 468.54,1099.31 438.54,1099.31 438.54,960.66
  region net OUT3_LED2: 399.91,986.94 399.91,1010.55 374.17,1010.55 374.17,986.94
  region net OUT3_SW2: 174.81,1013.93 174.81,990.32 256.73,990.32 256.73,1013.93
  region net NetJ9_2: 408.54,1575.12 408.54,1610.12 256.73,1610.12 256.73,1575.12
  region net NetQ6_3: 468.54,1472.47 468.54,1611.12 438.54,1611.12 438.54,1472.47
  region net OUT3_LED3: 399.91,1498.75 399.91,1522.36 374.17,1522.36 374.17,1498.75
  region net OUT3_SW3: 174.81,1525.74 174.81,1502.13 256.73,1502.13 256.73,1525.74
  region net NetJ16_2: 3293.75,1083.79 3293.75,1048.79 3445.56,1048.79 3445.56,1083.79
  region net NetQ12_3: 3233.75,1187.44 3233.75,1048.79 3263.75,1048.79 3263.75,1187.44
  region net OUT4_LED3: 3302.38,1161.16 3302.38,1137.55 3328.12,1137.55 3328.12,1161.16
  region net OUT4_SW3: 3527.48,1134.17 3527.48,1157.77 3445.56,1157.77 3445.56,1134.17
  region net NetJ14_2: 3293.75,1600.46 3293.75,1565.46 3445.56,1565.46 3445.56,1600.46
  region net NetQ10_3: 3233.75,1703.11 3233.75,1564.46 3263.75,1564.46 3263.75,1703.11
  region net OUT4_LED2: 3302.38,1676.83 3302.38,1653.22 3328.12,1653.22 3328.12,1676.83
  region net OUT4_SW2: 3527.48,1649.84 3527.48,1673.44 3445.56,1673.44 3445.56,1649.84
  region net NetJ12_2: 3293.75,2111.27 3293.75,2076.27 3445.56,2076.27 3445.56,2111.27
  region net NetQ8_3: 3233.75,2214.92 3233.75,2076.27 3263.75,2076.27 3263.75,2214.92
  region net OUT4_LED1: 3302.38,2188.64 3302.38,2165.03 3328.12,2165.03 3328.12,2188.64
  region net OUT4_SW1: 3527.48,2161.65 3527.48,2185.26 3445.56,2185.26 3445.56,2161.65
  rectangle net NetJ15_2: 3169.61,2509.2 3204.61,2661.01
  rectangle net NetQ11_3: 3066.96,2449.2 3205.61,2479.2
  rectangle net OUT2_LED3: 3093.24,2517.83 3116.85,2543.57
  region net OUT2_SW3: 3120.23,2742.93 3096.62,2742.93 3096.62,2661.01 3120.23,2661.01
  rectangle net NetJ13_2: 2658.8,2509.2 2693.8,2661.01
  rectangle net NetQ9_3: 2555.15,2449.2 2693.8,2479.2
  rectangle net OUT2_LED2: 2580.43,2517.83 2604.04,2543.57
  region net OUT2_SW2: 2608.42,2742.93 2584.81,2742.93 2584.81,2661.01 2608.42,2661.01
  rectangle net NetJ11_2: 2145.99,2509.2 2180.99,2661.01
  rectangle net NetQ7_3: 2043.34,2449.2 2181.99,2479.2
  rectangle net OUT2_LED1: 2068.62,2517.83 2092.23,2543.57
  region net OUT2_SW1: 2096.61,2742.93 2073,2742.93 2073,2661.01 2096.61,2661.01
  rectangle net NetJ8_2: 1584.61,2509.2 1619.61,2661.01
  rectangle net NetQ5_3: 1481.96,2449.2 1603.49,2479.2
  rectangle net OUT1_LED3: 1508.24,2517.83 1531.85,2543.57
  region net OUT1_SW3: 1535.23,2742.93 1511.62,2742.93 1511.62,2661.01 1535.23,2661.01
  rectangle net NetJ5_2: 1072.8,2509.2 1107.8,2661.01
  rectangle net NetQ3_3: 970.15,2449.2 1108.8,2479.2
  rectangle net OUT1_LED2: 996.43,2517.83 1020.04,2543.57
  region net OUT1_SW2: 1023.42,2742.93 999.81,2742.93 999.81,2661.01 1023.42,2661.01
  region net OUT1_SW1: 511.61,2742.93 488,2742.93 488,2661.01 511.61,2661.01
  rectangle net OUT1_LED1: 484.62,2517.83 508.23,2543.57
  rectangle net NetQ1_3: 458.34,2449.2 596.99,2479.2
  rectangle net NetJ2_2: 560.99,2509.2 595.99,2661.01
  rectangle net NetC11_2: 647.87,1670.34 737.4,1681.27
  rectangle net NetC11_2: 647.87,1650.81 681.28,1677.72
  rectangle net NetR1_2: 757.09,1725.95 766.93,1784.93
  rectangle net 5V: 594.67,1605.71 618.27,1632.96
  rectangle net NetL1_2: 829.92,1599.53 1017.36,1669.85
  rectangle net NetL1_2: 772.84,1647.4 1007.36,1669.85
  rectangle net NetL1_1: 772.84,1695.44 1017.36,1713.58
  rectangle net NetR3_1: 623.99,1687.57 737.4,1697.41
  rectangle net NetR3_1: 588.99,1677.96 635.54,1697.41
Power Layer (plane layer: these items are gaps in the copper):
  lines w20: 650.96,627.34 673.62,650 1258.98,650 1284.29,675.31 ; 652,627.34 652,118.88 671.88,99 3027,99 3051,123 3051,437 3027,461 1498.95,461 1468.91,491.04 1468.91,1976.18 1446.09,1999 1307.85,1999 1286,1977.15 1286,675.31 ; 1286,1502.47 1286,1482.63 1143.34,1482.63 1062.77,1402.06 581.28,1402.06 553.87,1429.47 553.87,1766.87 580,1793 1002,1793 1047,1838 1047,2110.68 1088.39,2152.07 1649.37,2152.07 1678.65,2122.79 1678.65,1193 1723.67,1147.98 2567.65,1147.98 2817.77,1147.98 2817.77,945 1524.02,945 1468.62,1000.41

## Silkscreen, mask and mechanical layers (free items; w line width, h text height)
Top Overlay:
  text "PLAY/STOP [1]" at 778.65,3026.14 h70 r180
  text "VOL-UP [1]" at 1290.46,3026.14 h70 r180
  text "VOL-DOWN [1]" at 1803.27,3026.14 h70 r180
  text "PLAY/STOP [2]" at 2363.65,3026.14 h70 r180
  text "VOL-UP  [2]" at 2875.46,3026.14 h70 r180
  text "VOL-DOWN [2]" at 3388.27,3026.14 h70 r180
  text "DC INPUT" at -56.5,2415.1 h60
  text "RESET" at 1776.74,2260.08 h60
  text "BOOT0" at 2093.48,2259.75 h60
  text "BOOT1" at 2459.48,2259.75 h60
  text "PROGRAMMING" at 2719.19,1946.32 h60
  text "PLAY/STOP [4]" at 3813.31,1893.47 h70 r90
  text "PLAY/STOP [3]" at -114.97,1793.78 h70 r270
  text "VOL-UP [4]" at 3813.31,1381.34 h70 r90
  text "VOL-UP [3]" at -113.71,1281.97 h70 r270
  text "VOL-DOWN [4]" at 3813.31,863.85 h70 r90
  text "VOL-DOWN [3]" at -113.71,770.15 h70 r270
  text "SPDIF OUT1" at 490.2,-89.08 h70 r90
  text "SPDIF OUT2" at 1031.14,-95.08 h70 r90
  text "SPDIF OUT3" at 1572.09,-95.08 h70 r90
  text "SPDIF OUT4" at 2113.03,-97.08 h70 r90
  text "SDPIF IN" at 2897.53,-99.08 h70 r90
Dimensions:
  drawing of 295 lines, arcs and shapes, not listed
  text "Layer" at 55.34,5258 h60
  text "Name" at 465.26,5258 h60
  text "Material" at 1395,5258 h60
  text "Thickness" at 2254.77,5258 h60
  text "Constant" at 2904.6,5258 h60
  text "Board Layer Stack" at 3474.46,5258 h60
  text "Top Overlay" at 465.26,5138 h60
  text "Top Solder" at 465.26,5018 h60
  text "Solder Resist" at 1395,5018 h60
  text "0.010mm" at 2254.77,5018 h60
  text "3.5" at 2904.6,5018 h60
  text "1" at 55.34,4898 h60
  text "Top Layer" at 465.26,4898 h60
  text "0.035mm" at 2254.77,4898 h60
  text "Dielectric 2" at 465.26,4778 h60
  text "PP-006" at 1395,4778 h60
  text "0.122mm" at 2254.77,4778 h60
  text "4.2" at 2904.6,4778 h60
  text "2" at 55.34,4658 h60
  text "Ground Layer" at 465.26,4658 h60
  text "CF-004" at 1395,4658 h60
  text "0.035mm" at 2254.77,4658 h60
  text "Dielectric 1" at 465.26,4538 h60
  text "FR-4" at 1395,4538 h60
  text "1.150mm" at 2254.77,4538 h60
  text "4.2" at 2904.6,4538 h60
  text "3" at 55.34,4418 h60
  text "Power Layer" at 465.26,4418 h60
  text "CF-004" at 1395,4418 h60
  text "0.035mm" at 2254.77,4418 h60
  text "Dielectric 3" at 465.26,4298 h60
  text "PP-006" at 1395,4298 h60
  text "0.122mm" at 2254.77,4298 h60
  text "4.2" at 2904.6,4298 h60
  text "4" at 55.34,4178 h60
  text "Bottom Layer" at 465.26,4178 h60
  text "0.035mm" at 2254.77,4178 h60
  text "Bottom Solder" at 465.26,4058 h60
  text "Solder Resist" at 1395,4058 h60
  text "0.010mm" at 2254.77,4058 h60
  text "3.5" at 2904.6,4058 h60
  text "Bottom Overlay" at 465.26,3938 h60
  text "Total board thickness:" at 55.34,3818 h60
  text "1.554mm" at 2254.77,3818 h60
Board Outline:
  the board outline again, w5
Drill Drawing:
  circle w10: c4893.62,4497.83 r33.33
  lines w10: 4860.29,4164.5 4860.29,4181.17 4876.96,4197.83 4860.29,4214.5 4860.29,4231.17 4876.96,4231.17 4893.62,4214.5 4910.29,4231.17 4926.96,4231.17 4926.96,4214.5 4910.29,4197.83 4926.96,4181.17 4926.96,4164.5 4910.29,4164.5 4893.62,4181.17 4876.96,4164.5 4860.29,4164.5 ; 4860.29,4314.5 4926.96,4314.5 4926.96,4381.17 4860.29,4381.17 4860.29,4314.5 ; 4860.29,4614.5 4893.62,4631.17 4926.96,4614.5 4910.29,4647.83 4926.96,4681.17 4893.62,4664.5 4860.29,4681.17 4876.96,4647.83 4860.29,4614.5 ; 4860.29,4781.17 4876.96,4781.17 4876.96,4764.5 4910.29,4764.5 4910.29,4781.17 4926.96,4781.17 4926.96,4814.5 4910.29,4814.5 4910.29,4831.17 4876.96,4831.17 4876.96,4814.5 4860.29,4814.5 4860.29,4781.17 ; 4860.29,4981.17 4926.96,4981.17 4893.62,4914.5 4860.29,4981.17 ; 4860.29,5081.17 4876.96,5081.17 4893.62,5064.5 4910.29,5081.17 4926.96,5081.17 4910.29,5097.83 4926.96,5114.5 4910.29,5114.5 4893.62,5131.17 4876.96,5114.5 4860.29,5114.5 4876.96,5097.83 4860.29,5081.17
  lines w15: 4800.5,4119.5 15361.57,4119.5 ; 4800.5,5169.5 15361.57,5169.5 ; 5351.38,3969.5 5351.38,5319.5 ; 5951.22,3969.5 5951.22,5319.5 ; 7070.89,3969.5 7070.89,5319.5 ; 7576.77,3969.5 7576.77,5319.5 ; 8310.57,3969.5 8310.57,5319.5 ; 9810.12,3969.5 9810.12,5319.5 ; 10399.97,3969.5 10399.97,5319.5 ; 11145.77,3969.5 11145.77,5319.5 ; 11795.59,3969.5 11795.59,5319.5 ; 12649.36,3969.5 12649.36,5319.5 ; 13982.97,3969.5 13982.97,5319.5 ; 4800.5,3969.5 15361.57,3969.5 15361.57,5319.5 4800.5,5319.5 4800.5,3969.5
  text "Symbol" at 4890.5,5214.5 h72
  text "Count" at 5396.38,5214.5 h72
  text "Hole Size" at 5996.22,5214.5 h72
  text "Plated" at 7115.89,5214.5 h72
  text "Hole Type" at 7621.77,5214.5 h72
  text "Drill Layer Pair" at 8355.57,5214.5 h72
  text "Via/Pad" at 9855.12,5214.5 h72
  text "Pad Shape" at 10444.97,5214.5 h72
  text "Template" at 11190.77,5214.5 h72
  text "Description" at 11840.59,5214.5 h72
  text "Hole Tolerance (+)" at 12694.36,5214.5 h72
  text "Hole Tolerance (-)" at 14027.97,5214.5 h72
  text "1" at 5396.38,5064.5 h60
  text "62.99mil (1.600mm)" at 5996.22,5064.5 h60
  text "NPTH" at 7115.89,5064.5 h60
  text "Round" at 7621.77,5064.5 h60
  text "Top Layer - Bottom Layer" at 8355.57,5064.5 h60
  text "Pad" at 9855.12,5064.5 h60
  text "Rounded" at 10444.97,5064.5 h60
  text "c250hn160" at 11190.77,5064.5 h60
  text "1" at 5396.38,4914.5 h60
  text "70.87mil (1.800mm)" at 5996.22,4914.5 h60
  text "NPTH" at 7115.89,4914.5 h60
  text "Round" at 7621.77,4914.5 h60
  text "Top Layer - Bottom Layer" at 8355.57,4914.5 h60
  text "Pad" at 9855.12,4914.5 h60
  text "Rounded" at 10444.97,4914.5 h60
  text "c250hn180" at 11190.77,4914.5 h60
  text "4" at 5396.38,4764.5 h60
  text "118.11mil (3.000mm)" at 5996.22,4764.5 h60
  text "PTH" at 7115.89,4764.5 h60
  text "Round" at 7621.77,4764.5 h60
  text "Top Layer - Bottom Layer" at 8355.57,4764.5 h60
  text "Pad" at 9855.12,4764.5 h60
  text "Rounded" at 10444.97,4764.5 h60
  text "c0h300" at 11190.77,4764.5 h60
  text "6" at 5396.38,4614.5 h60
  text "35.43mil (0.900mm)" at 5996.22,4614.5 h60
  text "PTH" at 7115.89,4614.5 h60
  text "Round" at 7621.77,4614.5 h60
  text "Top Layer - Bottom Layer" at 8355.57,4614.5 h60
  text "Pad" at 9855.12,4614.5 h60
  text "(Mixed)" at 10444.97,4614.5 h60
  text "(Mixed)" at 11190.77,4614.5 h60
  text "10" at 5396.38,4464.5 h60
  text "44.09mil (1.120mm)" at 5996.22,4464.5 h60
  text "PTH" at 7115.89,4464.5 h60
  text "Round" at 7621.77,4464.5 h60
  text "Top Layer - Bottom Layer" at 8355.57,4464.5 h60
  text "Pad" at 9855.12,4464.5 h60
  text "Rounded" at 10444.97,4464.5 h60
  text "c220h112" at 11190.77,4464.5 h60
  text "15" at 5396.38,4314.5 h60
  text "32.28mil (0.820mm)" at 5996.22,4314.5 h60
  text "PTH" at 7115.89,4314.5 h60
  text "Round" at 7621.77,4314.5 h60
  text "Top Layer - Bottom Layer" at 8355.57,4314.5 h60
  text "Pad" at 9855.12,4314.5 h60
  text "Rounded" at 10444.97,4314.5 h60
  text "c160h82" at 11190.77,4314.5 h60
  text "263" at 5396.38,4164.5 h60
  text "11.81mil (0.300mm)" at 5996.22,4164.5 h60
  text "PTH" at 7115.89,4164.5 h60
  text "Round" at 7621.77,4164.5 h60
  text "Top Layer - Bottom Layer" at 8355.57,4164.5 h60
  text "Via" at 9855.12,4164.5 h60
  text "Rounded" at 10444.97,4164.5 h60
  text "v60h30m70" at 11190.77,4164.5 h60
  text "300 Total" at 5396.38,4014.5 h60

## Dimensions
-118.11,3031.5 to 3818.9,3031.5 on Dimensions
3818.9,3031.5 to 3818.9,-118.11 on Dimensions

## Text inside footprints (layer, text, board x,y; h text height)
U5: Top Overlay "1" at 2931.05,126.4 h30
U8: Top Overlay "1" at 539.75,126.48 h30
U9: Top Overlay "1" at 1081.05,124.08 h30
U11: Top Overlay "1" at 1619.91,127.97 h30
U12: Top Overlay "1" at 2163.64,127.15 h30